# Altium PCB GamingMouse-v1.1.PcbDoc (part 3 of 3)
Units mil, origin at the board's own origin, x right, y up, seen from the top; angles counter-clockwise.
Board outline 3390 x 1696.57 mil, 2 copper layers (Top Layer, Bottom Layer), stack 61.811 mil thick; 112 components, 70 nets, 346 pads, 115 vias.
Unrouted connection lines stored in the file: 47.
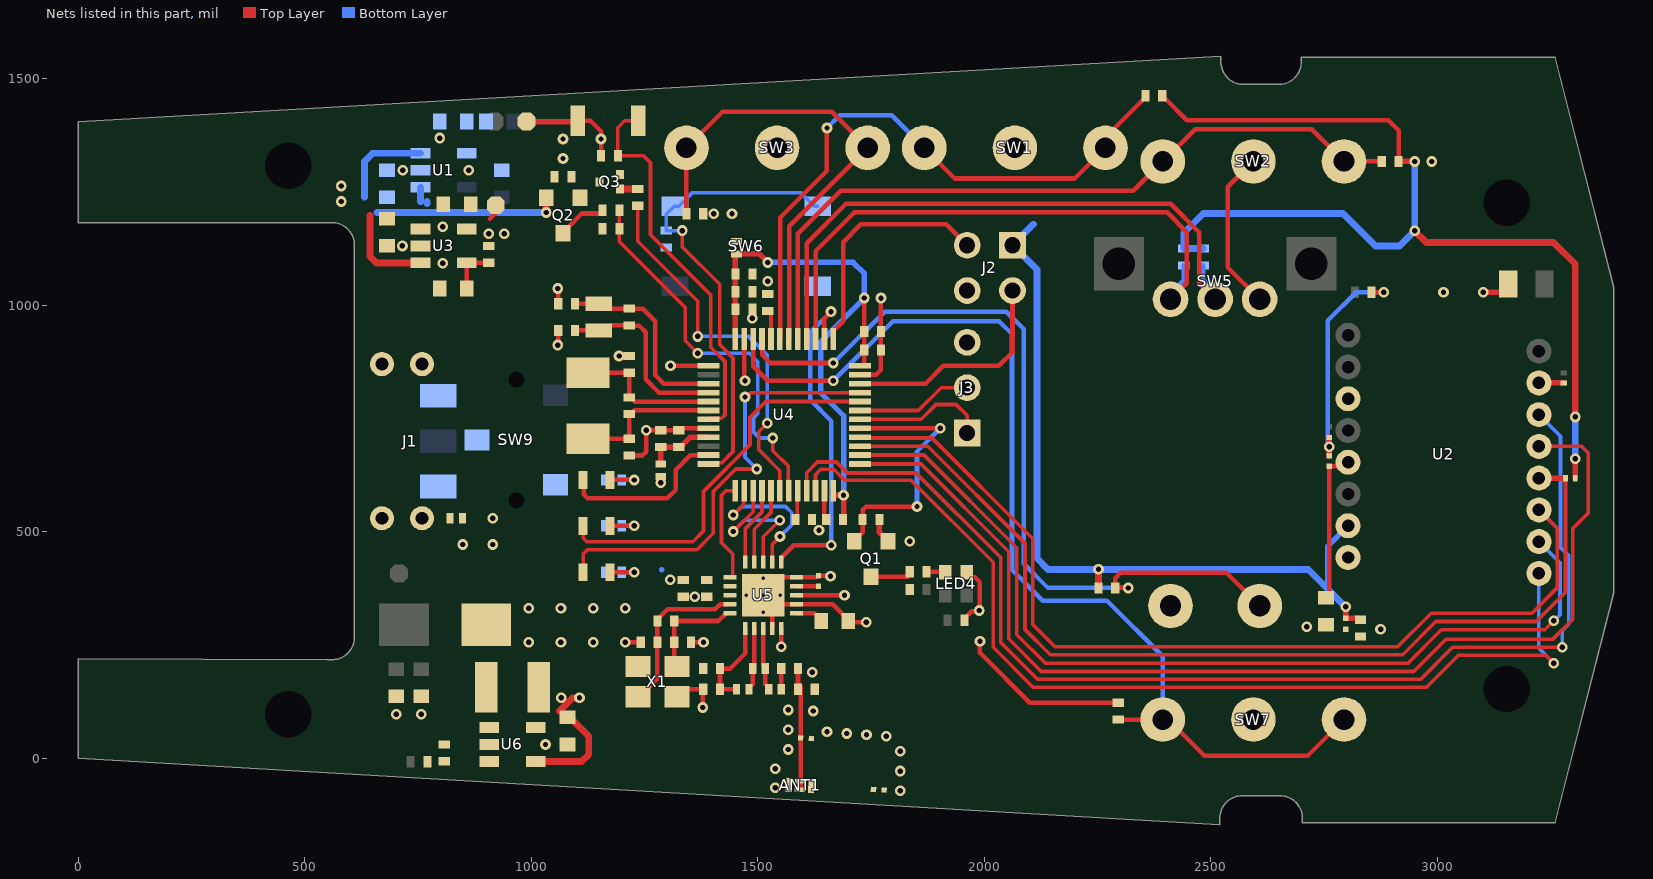
[diagram p2: the nets of this part, all layers, seen from the top]

## Via types
v1: diameter 23.62, hole 11.81, Top Layer to Bottom Layer, tented both sides, 101 vias
v2: diameter 23.62, hole 11.81, Top Layer to Bottom Layer, 14 vias

## Nets (pads, with @x,y where several pads share a name; then routed paths per layer and width w, separated by ;. In a path a pad name is that pad's centre, name@x,y a point inside that pad or via, vN(x,y) a via of type N, cw(c..) or ccw(c..) an arc to the next point about the centre after c; other vN are vias at no path point) (continued)
+3.3V: C8.2 C9.2 C10.2 C12.2 C13.2 C36.2 FB2.2 FB3.1 J2.1 L4.1 P3.1 Q1.1 R3.2 R5.2 R6.2 R7.2 R17.2 R18.2 R19.2 R20.2 R23.2 R24.2 R25.1 U2.7 U3.5 U4.1 U5.7 U5.15 U5.18 U6.4 U6.5 | length 5067
  Top Layer w10: 909.18,1191.01 919.17,1201 ; v1(1307.73,866.28) U4.1@1391.54,866.28 ; v1(1551.76,246.26) U5.15@1551.76,286.18 ; U5.18@1586.01,359.8 1586.09,359.88 1691.34,359.88 v1(1691.71,360.24) ; Q1.1@1787.6,479.38 Q1.1@1787.6,481.35 ; v1(1990.68,258.65) 1990.68,232.81 2100.89,122.59 R24.2@2295.72,122.59 ; R17.2@2393.02,1462.67 2393.02,1459.17 2397.02,1455.17 2400.52,1455.17 2446.91,1408.78 2891.89,1408.78 2914.69,1385.98 R18.2@2914.69,1317.5
  Top Layer w12: R25.1@1768.7,527.01 1768.7,498.52 1775.73,491.49 1777.46,491.49 Q1.1@1787.6,481.35 ; v1(2797.83,334.44) C8.2@2797.83,308.78 2827.93,308.78 C9.2@2830.82,305.89 ; R18.2@2914.69,1317.5 v1(2950.32,1317.5)
  Top Layer w13: R3.2@3304.74,618.45 v1(3304.74,660.96)
  Top Layer w15: U6.4@1009.96,-6.86 1111.61,-6.86 1127.3,8.83 1127.3,48.62 1085.38,90.54 C36.2@1079.96,90.54 ; 1061.89,103.82 1091.51,133.44 v1(1106.86,133.44) ; v1(1286.43,607.96) FB3.1@1286.43,622.19 ; R19.2@2252.21,376.01 v1(2252.21,416.99) ; v1(2950.32,1164.25) 2975.94,1138.62 3256.94,1138.62 3304.74,1090.83 v1@3304.74,758.21 ; v1@3300.1,753.58 v1@3304.74,758.21 ; v1(3304.74,753.58) v1@3304.74,758.21 ; v1@3305.91,759.39 v1@3304.74,758.21
  Bottom Layer w12: 1287.86,415.8 1288.14,416.08 ; 2757.97,374.31 2757.97,468.03 U2.7@2803.27,513.33
  Bottom Layer w15: 2108.94,1178.94 J2.1@2062.5,1132.5 2116.48,1078.52 2116.48,441.64 2141.14,416.99 v1(2252.21,416.99) 2715.29,416.99 2757.97,374.31 v1(2797.83,334.44) ; R6.2@2483.51,1125.07 R5.2@2440.53,1125.07 2440.53,1159.51 2483.57,1202.56 2792.26,1202.56 2863.87,1130.95 2917.02,1130.95 v1(2950.32,1164.25) v1(2950.32,1317.5) ; v1(3304.74,660.96) v1(3304.74,753.58)
  other v1: 1066.37,133.44 1307.15,394.36 1835.86,479.38 906.18,1158.01 940.63,1158.12 1403.28,1202.3 1443.44,1202.3
ADJ1: R1.1 R2.2 U1.4
ADJ2: R7.1 R8.2 U3.4 | length 107.7
  Top Layer w10: R8.2@858.04,1037.13 U3.4@858.04,1093.61 858.12,1093.69 909.11,1093.69 R7.1@909.18,1093.76
ANT: ANT1.2 ANT1.3 C16.2 C17.1 C38.2 | length 279.5
  Top Layer w10: C16.2@1589.08,198.11 C17.1@1589.08,152.18 C17.1@1593.08,148.18 ; ANT1.2@1594.86,-69.01 C38.2@1594.86,45.01 C17.1@1594.86,158.95
BAT_ADC: R28.1 R31.2 U4.19 | length 865.1
  Top Layer w8: R28.1@1194.74,1209.64 R31.2@1194.74,1168.82 1194.74,1140.54 1340.38,994.9 1340.38,921.54 v1(1367.52,894.39) ; v1(1533.52,707.02) 1533.52,678.98 1567.32,645.19 1567.32,615.32
  Top Layer w10: 1567.32,615.32 1567.41,615.23 1567.41,591.99 U4.19@1568.71,590.69
  Bottom Layer w8: v1(1367.52,894.39) 1481.29,894.39 1500.52,875.16 1500.52,760.77 1491.74,751.99 1491.74,719.25 1503.98,707.02 v1(1533.52,707.02)
BAT_STAT: R30.1 U4.18 | length 840.4
  Top Layer w8: R30.1@1235.18,1219.8 1235.18,1141.03 1367.52,1008.69 v1(1367.52,931.24) ; v1(1520.9,739.46) 1502.2,720.77 1502.2,681.51 1549.01,634.7 U4.18@1549.01,590.7
  Bottom Layer w8: v1(1367.52,931.24) 1479.8,931.24 1520.9,890.14 v1(1520.9,739.46)
CPI: R23.1 SW6.1 SW6.2 U4.12 | length 1037.8
  Top Layer w8: v1(1333.86,1164.83) 1333.86,1128.41 1416.03,1046.24 1416.03,913.4 1445.61,883.83 1445.61,677.2 1420.45,652.04 1393.84,652.04 U4.12@1391.54,649.74
  Bottom Layer w8: v1(1333.86,1164.83) R23.1@1297.95,1164.83 1297.95,1201.1 1315.61,1218.76 SW6.2@1317.76,1218.76 1325.63,1218.76 1354.88,1248 1595.6,1248 1624.85,1218.76 SW6.1@1632.72,1218.76
GND: ANT1.4 C1.1 C2.1 C3.1 C4.1 C5.1 C6.1 C7.1 C8.1 C9.1 C10.1 C11.1 C12.1 C13.1 C14.1 C15.1 C17.2 C18.2 C19.1 C20.2 C21.1 C22.1 C23.1 C24.1 C25.1 C26.1 C27.1 C28.2 C29.1 C30.1 C31.1 C32.1 C33.1 C34.1 C35.1 C36.1 C37.2 C38.1 C39.1 FB1.2 J2.4 J3.3 LED4.3 P5.1 Q3.2 R2.1 R8.1 R9.1 R10.1 R11.2 R12.1 R21.1 R31.1 R34.2 R35.1 SW1.2 SW2.2 SW3.2 SW4.2 SW5.C SW6.3 SW7.2 SW8.2 U1.2 U2.3 U2.8 U3.2 U4.8 U4.23 U4.35 U4.47 U5.8 U5.14 U5.17 U5.20 U5.21 U6.2 X1.2 X1.4 | length 2607.6
  Top Layer w10: v1(1059,912.13) 1059.43,912.56 1059.43,944.05 C33.1@1059.86,944.48 ; v1(1059,1037.13) 1059.43,1036.69 1059.43,1003.97 C31.1@1059.86,1003.54 ; SW8.2@1101.19,1405.27 SW8.2@1102.93,1407.01 1131.11,1407.01 1154.36,1383.76 C30.1@1154.36,1330.01 ; v1(1194.13,888.08) C32.1@1216.36,888.08 ; v1(1208,256.11) 1240.66,256.1 C28.2@1241.86,256.1 ; C29.1@1216.36,668.41 1245.58,668.41 1253.86,676.69 v1(1253.86,724.01) C20.2@1286.43,724.01 C19.1@1325.86,724.01 1331.64,724.01 1336.11,728.48 U4.8@1391.54,728.48 ; X1.4@1322.17,135.63 1338.71,152.18 C14.1@1379.86,152.18 1378.69,151 v1(1378.69,112.01) ; C18.2@1352.86,256.1 v1(1380.53,256.09) ; U4.47@1470.28,925.34 1470.28,834.96 v1(1472.03,833.21) ; U5.21@1512.39,359.8 U5.21@1532.08,340.11 ; U5.21@1512.39,397.2 1514.36,399.17 U5.20@1586.01,399.17 1630.45,399.17 C27.1@1634.39,403.11 1634.95,402.54 1660.27,402.54 v1(1660.83,401.98) ; U5.14@1532.08,286.18 U5.21@1532.08,340.11 ; U4.23@1647.45,590.69 1647.45,527.01 1649.45,525.01 C22.1@1649.45,521.51 ; U4.35@1726.19,846.59 1761.38,846.59 1772.19,857.4 C23.1@1772.19,901.32 C21.1@1772.19,942.22 v1(1772.19,1015.84) ; v1(1739.86,300.17) 1702.88,300.17 R12.1@1700.19,302.87 1700.19,305.37 1665.44,340.11 U5.17@1586.01,340.11 U5.21@1532.08,340.11 ; C37.2@1956.36,304.96 1956.36,308.46 1972.42,324.51 1987.14,324.51 v1(1988.91,326.28) ; LED4.3@1961.49,410.58 1961.49,408.61 1970.26,399.83 1979.77,399.83 1990.68,388.93 v1@1990.68,324.51 ; SW2.2@2594.25,1317.5 2538,1261.25 2538,1083.46 SW5.C@2608.19,1013.27 ; C2.1@2855.23,1029.01 2855.48,1028.76 2881.61,1028.76 v1(2881.86,1028.51)
  Top Layer w12: P5.1@989.86,1405.27 SW8.2@1101.19,1405.27 ; C6.1@2761.86,667.97 C1.1@2761.86,708.2 ; v1(3101.86,1028.51) 3142.86,1028.51 3157.76,1043.41 C7.1@3157.76,1044.94
  Top Layer w15: R8.1@797.86,1028.31 R8.1@798.04,1028.13
  Bottom Layer w10: v1(2761.86,688.01) 2761.15,688.01 2758.5,690.65 2758.5,692.12 2757.92,692.7 2757.92,965.86 2821.08,1029.02 2881.36,1029.02 v1(2881.86,1028.51)
  other v1: 1031.61,30.54 702.24,97.01 757.36,97.01 994.59,256.11 1065.72,256.11 1136.86,256.11 2875,285.16 2712,290.13 994.59,331.01 1065.73,331.01 1136.86,331.01 1208,331.01 1360.86,356.67 848.72,471.99 915.22,471.99 1635.53,503.34 915.22,529.92 1488.04,971.16 3013.9,1028.51 1522.34,1053.01 804.88,1092.76 715.86,1131.01 804.88,1173.01 716.86,1298.01 861.99,1298.01 2987.86,1317.51 1070.44,1323.83 1070.44,1367.01 1154.36,1367.01 798.04,1369.01
  other v2: 1814.86,-71.85 1538.86,-64.77 1814.86,-28.23 1538.86,-22.99 1814.86,15.39 1567.21,19.56 1784.03,48.77 1740.41,51.77 1696.79,54.77 1653.16,58.77 1567.21,63.18 1622.51,104.56 1567.21,106.8 1620.31,189.75
"LED1 (TX)": J3.1 U4.30 | length 298.4
  Top Layer w8: U4.30@1726.19,748.17 1860.85,748.17 1893.67,780.98 1938.02,780.98 1962.5,756.5 J3.1@1962.5,718.13
"LED2 (RX)": J3.2 U4.31 | length 257.1
  Top Layer w8: U4.31@1726.19,767.85 1854.76,767.85 1905.03,818.13 J3.2@1962.5,818.13
LED_DIN: LED4.4 R27.2 | length 41.9
  Top Layer w10: R27.2@1872.86,411.74 1913.08,411.74 LED4.4@1914.24,410.58
LED_IO: Q1.2 R25.2 U4.29 | length 571.7
  Top Layer w10: Q1.2@1712.8,479.38 1712.8,481.35 1722.94,491.49 1724.67,491.49 1731.7,498.52 R25.2@1731.7,527.01 1732,527.31 1732,548.65 1739,555.66 v1(1851.7,555.66) ; U4.29@1726.19,728.48 v1(1903,728.48)
  Bottom Layer w10: v1(1851.7,555.66) 1851.7,677.19 v1(1903,728.48)
LEFT: R18.1 SW2.1 SW2.3 U4.41 | length 1646.9
  Top Layer w10: U4.41@1588.39,925.34 1588.39,1157.54 1683.33,1252.48 2329.23,1252.48 SW2.1@2394.25,1317.5 2465.62,1388.86 2722.89,1388.86 SW2.3@2794.25,1317.5 R18.1@2877.69,1317.5
MIDDLE: R19.1 SW4.1 U4.45 | length 1895.4
  Top Layer w10: U4.45@1509.65,925.34 1509.65,891.04 1528.12,872.58 v1(1667.13,872.58) ; v1(2318.28,376.01) R19.1@2289.21,376.01 2289.21,397.79 2301.47,410.05 2534.52,410.05 SW4.1@2608.19,336.39 ; SW4.1@2578.69,344.27 SW4.1@2602.85,320.12 ; SW4.1@2634.81,363.01 SW4.1@2636.16,361.66
  Bottom Layer w10: v1(1667.13,872.58) 1780.62,986.07 2049.06,986.07 2087.51,947.61 2087.51,429.33 2140.83,376.01 v1(2318.28,376.01)
NetANT1_1: ANT1.1 C39.2
NetC5_2: C5.2 C6.2 U2.5 | length 335.5
  Top Layer w10: C5.2@2754.48,354.39 2761.86,361.76 C6.2@2761.86,644.35 ; C6.2@2762.86,644.33 2794.73,644.33 U2.5@2802.22,651.81
NetC14_2: C14.2 C15.2 L1.2 U5.11 | length 207.1
  Top Layer w10: L1.2@1453.65,152.18 C14.2@1416.86,152.18 C15.2@1416.86,198.11 1439.2,198.11 1473.02,231.93 U5.11@1473.02,286.18
NetC16_1: C16.1 L3.2 | length 45.9
  Top Layer w10: L3.2@1552.08,152.18 C16.1@1552.08,198.11
NetC18_1: C18.1 R13.2 U5.10 X1.1 | length 237.3
  Top Layer w10: R13.2@1315.86,303.1 1413.36,303.1 1429.6,319.33 1429.6,320.35 1429.67,320.43 U5.10@1438.77,320.43 ; R13.2@1315.86,306.6 C18.1@1315.86,256.1 1315.86,208.87 X1.1@1322.17,202.56
NetC19_2: C19.2 C20.1 FB3.2 U4.9 | length 159.2
  Top Layer w12: C20.1@1281.3,684.01 C20.1@1284.3,687.01 ; C20.1@1282.93,687.01 C20.1@1284.3,687.01 ; FB3.2@1286.43,649.74 C20.1@1286.43,687.01 ; U4.9@1391.54,708.8 1391.24,708.5 1350.85,708.5 1329.36,687.01 C19.2@1325.86,687.01 C20.1@1286.43,687.01 ; C20.1@1284.3,687.01 C20.1@1286.43,687.01
NetC21_2: C21.2 C22.2 C23.2 C24.2 C25.2 C26.2 FB2.1 U4.24 U4.36 U4.48 | length 1279.8
  Top Layer w10: U4.36@1726.19,866.28 1733.89,866.28 1735.19,867.58 C23.2@1735.19,901.32 1735.36,901.49 1735.36,1015.84 v1(1735.53,1016.01)
  Top Layer w12: U4.48@1450.6,925.34 C26.2@1450.6,1068.33 ; C26.2@1451.01,1069.29 FB2.1@1451.01,1111.41 ; FB2.1@1453.28,1113.29 1503.59,1113.29 v1(1522.34,1094.54) ; U4.24@1667.13,590.69 1667.13,581.27 1667.43,580.97 v1(1689.59,580.97) 1689.59,528.16 C22.2@1688.45,527.01
  Bottom Layer w12: v1(1522.34,1094.54) 1710.77,1094.54 1735.53,1069.78 v1(1735.53,1016.01) 1638.83,919.32 1638.83,806.9 1689.59,756.14 v1(1689.59,580.97)
NetC27_2: C27.2 U5.19 | length 48.4
  Top Layer w10: U5.19@1586.01,379.48 C27.2@1634.39,379.48
NetC28_1: C28.1 R13.1 U5.9 X1.3 | length 361.1
  Top Layer w10: X1.3@1239.49,135.63 1278.86,175 C28.1@1278.86,256.1 1278.86,306.6 1301.74,329.48 1406.6,329.48 1417.24,340.11 U5.9@1438.77,340.11
NetD1_1: D1.1 L4.2 U6.1
NetFB1_1: FB1.1 J1.3 J1.MH1 J1.MH2 J1.MH3 J1.MH4 | length 15.8
  Top Layer w20: J1.MH2@759.15,870.08 767.8,870.08 J1.MH2@772.86,865.01
NetJ1_1: J1.1 SW9.2
NetL1_1: L1.1 L2.2 U5.12 | length 138.8
  Top Layer w10: L1.1@1481.21,152.18 1481.21,156.11 1489.08,163.99 L2.2@1489.08,198.11 1489.08,202.04 1492.71,205.67 U5.12@1492.71,286.18
NetL2_1: L2.1 L3.1 U5.13 | length 139
  Top Layer w10: U5.13@1512.39,286.18 1512.39,206.3 1516.64,202.04 L2.1@1516.64,198.11 1516.64,163.99 1524.52,156.11 L3.1@1524.52,152.18
NetLED1_2: LED1.2 R9.2 | length 80
  Top Layer w10: LED1.2@1174.93,614.31 1175.07,614.46 v1(1227.34,614.46)
  Bottom Layer w10: R9.2@1199.86,614.31 1199.94,614.38 1227.26,614.38 v1(1227.34,614.46)
NetLED2_2: LED2.2 R10.2 | length 80.9
  Top Layer w10: LED2.2@1173.86,513.31 v1(1227.34,513.31)
  Bottom Layer w10: R10.2@1199.86,513.31 v1(1227.34,513.31)
NetLED3_2: LED3.2 R11.1 | length 80.9
  Top Layer w10: LED3.2@1173.86,410.82 v1(1227.34,410.82)
  Bottom Layer w10: R11.1@1199.86,410.82 v1(1227.34,410.82)
NetQ1_3: Q1.3 R26.2 R27.1 | length 94.4
  Top Layer w10: Q1.3@1750.2,400.64 1831.86,400.64 1835.86,404.64 R27.1@1835.86,411.74
NetQ2_1: Q2.1 Q3.3 R29.2
NetQ3_1: Q3.1 R30.2 | length 38.9
  Top Layer w15: Q3.1@1196.25,1256.8 R30.2@1235.18,1256.8
NetR4_1: R4.1 U2.15 | length 54.6
  Top Layer w12: U2.15@3224.52,828.68 R4.1@3279.12,828.68
NetR12_2: R12.2 U5.16 | length 62.9
  Top Layer w10: U5.16@1586.01,320.43 1625.13,320.43 1640.19,305.37 R12.2@1640.19,302.87
NetR15_1: R15.1 R21.2 U6.3
NetR34_1: R34.1 U4.20 | length 65.8
  Top Layer w8: R34.1@1583.19,527.01 1587,530.82 1587,589.3 U4.20@1588.39,590.69
NetR35_2: R35.2 U4.44 | length 58
  Top Layer w8: U4.44@1529.34,925.34 R35.2@1529.34,983.37
NRST: C30.2 SW8.1 U4.7 | length 892.4
  Top Layer w8: SW8.1@1224.65,1377.15 1236.79,1389.3 SW8.1@1236.79,1407.01 1206.65,1407.01 1191.36,1391.73 C30.2@1191.36,1330.01 1248.1,1330.01 1263.38,1314.73 1263.38,1155.63 1396.26,1022.75 1396.26,907.63 1428.05,875.84 1428.05,757.73 1420.66,750.34 1393.71,750.34 U4.7@1391.54,748.17
OSC32_IN: C31.2 R16.2 U4.3 X3.2 | length 437.6
  Top Layer w10: C31.2@1096.86,1003.54 X3.2@1149.36,1003.54 1163.14,1003.54 1174.17,992.51 R16.2@1216.36,992.51 1246.32,992.51 1273.84,965 1273.84,845.93 1292.86,826.91 U4.3@1391.54,826.91
OSC32_OUT: C33.2 R16.1 U4.4 X3.1 | length 421.5
  Top Layer w10: C33.2@1096.86,944.48 X3.1@1149.36,944.48 1163.14,944.48 1174.17,955.51 R16.1@1216.36,955.51 1216.68,955.19 1238.01,955.19 1252.75,940.45 1252.75,836.59 1282.11,807.22 1351.73,807.22 U4.4@1391.54,807.22
OSCIN: C32.2 R14.1 U4.5 X2.2 | length 324.3
  Top Layer w10: X2.2@1125.36,851.08 C32.2@1216.36,851.08 R14.1@1216.36,796.74 1219.86,796.74 1229.06,787.54 U4.5@1391.54,787.54
OSCOUT: C29.2 R14.2 U4.6 X2.1 | length 323.9
  Top Layer w10: X2.1@1125.36,705.41 C29.2@1216.36,705.41 R14.2@1216.36,759.74 1219.86,759.74 1227.98,767.85 U4.6@1391.54,767.85
PA1: LED1.1 U4.11 | length 376.3
  Top Layer w10: LED1.1@1115.87,614.31 1115.87,582.57 1124.43,574.01 1300.76,574.01 1319.66,592.92 1319.66,637.02 1351.47,668.82 1390.93,668.82 U4.11@1391.54,669.43
PA11: LED2.1 U4.32 | length 856.1
  Top Layer w8: LED2.1@1114.81,512.56 1115.37,512 1115.37,485.56 1122.97,477.97 1356.52,477.97 1380.49,501.93 1380.49,589.1 1483.22,691.83 1483.22,752.68 1518.08,787.54 U4.32@1726.19,787.54
PA12: LED3.1 U4.33 | length 983
  Top Layer w8: LED3.1@1114.81,410.82 1114.81,450.85 1124.49,460.54 1365.97,460.54 1402.11,496.68 1402.11,588.82 1451.9,638.61 v1(1498.14,638.61) ; v1(1472.03,797.54) 1474.85,797.54 1484.53,807.22 U4.33@1726.19,807.22
  Bottom Layer w8: v1(1472.03,797.54) 1472.03,664.71 v1(1498.14,638.61)
PAW_MISO: R3.1 U2.12 U4.27 | length 2222.6
  Top Layer w8: U4.27@1726.19,689.11 1875.28,689.11 2090.1,474.3 2090.1,284.25 2145.75,228.6 2923.76,228.6 2997,301.85 3218.31,301.85 3283.08,366.63 R3.1@3283.08,618.45
  Top Layer w12: U2.12@3224.52,618.45 R3.1@3279.12,618.45
PAW_MOSI: U2.11 U4.28 | length 2083.9
  Top Layer w8: U4.28@1726.19,708.8 1727.97,707.01 1884.83,707.01 2106.93,484.91 2106.93,295.59 2156.5,246.01 2912.29,246.01 2986.6,320.32 3209.02,320.32 3264.6,375.9 3264.6,508.29 U2.11@3224.52,548.37
PAW_MOTION: U2.9 U4.22 | length 2227
  Top Layer w8: U4.22@1627.76,590.69 1627.76,626.13 1639.47,637.84 1667.85,637.84 1691.63,614.05 1838.26,614.05 2019.79,432.52 2019.79,245.32 2108.62,156.5 2975.51,156.5 3046.14,227.13 3240.41,227.13 v1(3257.41,210.13)
  Bottom Layer w8: U2.9@3224.52,408.21 3224.52,243.02 v1(3257.41,210.13)
PAW_RESET: U2.14 U4.21 | length 2603.9
  Top Layer w8: U4.21@1608.08,590.69 1606.63,590.69 1608.08,592.14 1608.08,630.44 1631.74,654.1 1674.23,654.1 1698.45,629.88 1849.57,629.88 2036.93,442.52 2036.93,255.29 2118.11,174.1 2962.98,174.1 3033.89,245.02 v1(3275.91,245.02)
  Bottom Layer w8: U2.14@3224.52,758.6 3272.26,710.87 3272.26,465.49 3290.05,447.7 3290.05,295.76 3275.91,281.62 v1(3275.91,245.02)
PAW_SCK: U2.10 U4.26 | length 2074.7
  Top Layer w8: U4.26@1726.19,669.43 1867.2,669.43 2072.16,464.47 2072.16,272.74 2135.16,209.74 2935.45,209.74 3009.17,283.47 3237.41,283.47 v1(3257.41,303.47) 3259,305.05 v1@3259,305.13
  Bottom Layer w8: U2.10@3224.52,478.29 3270.92,431.89 3270.92,316.98 v1(3257.41,303.47)
PAW_SS: U2.13 U4.25 | length 2419.4
  Top Layer w8: U4.25@1726.19,649.74 1860.38,649.74 2053.93,456.19 2053.93,263.79 2126.17,191.55 2948.21,191.55 3019.78,263.13 3255.53,263.13 3299.56,307.16 3299.56,507.76 3333.44,541.63 3333.44,673.69 3318.6,688.52 U2.13@3224.52,688.52
REAR_DOWN: R20.1 SW3.1 SW3.3 U4.42 | length 1105.4
  Top Layer w10: R20.1@1342.86,1202.3 SW3.1@1342.86,1347.5 1422.38,1427.01 1663.35,1427.01 SW3.3@1742.86,1347.5 1569.63,1174.26 1569.63,926.26 U4.42@1568.71,925.34
REAR_UP: R17.1 SW1.1 SW1.3 U4.43 | length 1373
  Top Layer w10: U4.43@1549.02,925.34 1550.1,926.42 1550.1,1193.87 1653,1296.77 v1(1653,1391.13) ; SW1.1@1867.75,1347.5 1935.42,1279.83 2200.08,1279.83 SW1.3@2267.75,1347.5 2267.75,1370.9 2356.02,1459.17 R17.1@2356.02,1462.67
  Bottom Layer w10: v1(1653,1391.13) 1681.39,1419.51 1795.74,1419.51 SW1.1@1867.75,1347.5
RF_CE: U4.38 U5.1 | length 752.3
  Top Layer w10: U5.1@1551.76,433.42 1551.76,442.52 1579.6,470.36 v1(1662.66,470.36) ; U4.38@1647.45,925.34 1647.45,971.6 v1(1661.92,986.07)
  Bottom Layer w10: v1(1661.92,986.07) 1616.01,940.16 1616.01,791.16 1662.66,744.51 v1(1662.66,470.36)
RF_IRQ: U4.13 U5.6 | length 231.9
  Top Layer w8: U5.6@1438.77,399.17 1444.01,399.17 1444.93,400.09 1444.93,450.92 1420.31,475.54 1420.31,580.89 1430.11,590.69 U4.13@1450.6,590.69
RF_MISO: U4.16 U5.5 | length 172.4
  Top Layer w8: U5.5@1473.02,433.42 1473.02,507.26 1509.65,543.89 U4.16@1509.65,590.69
RF_MOSI: U4.17 U5.4 | length 172.4
  Top Layer w8: U5.4@1492.71,433.42 1492.71,505.83 1529.34,542.46 U4.17@1529.34,590.69
RF_SCK: U4.15 U5.3 | length 328.8
  Top Layer w8: v1(1446.12,500.52) 1489.97,544.37 U4.15@1489.97,590.69 ; U5.3@1512.39,433.42 1512.39,488.88 v1(1549,525.5)
  Bottom Layer w8: v1(1446.12,500.52) 1471.1,525.5 v1(1549,525.5)
RF_SS: U4.14 U5.2 | length 332.8
  Top Layer w8: v1(1446.12,537.02) 1469.39,560.29 1469.39,589.8 U4.14@1470.28,590.69 ; U5.2@1532.08,433.42 1532.08,472.07 v1(1549.47,489.46)
  Bottom Layer w8: v1(1446.12,537.02) 1465.03,555.94 1561.28,555.94 1575.16,542.06 1575.16,515.16 v1(1549.47,489.46)
RIGHT: R24.1 SW7.1 SW7.3 U4.46 | length 2346.6
  Top Layer w10: U4.46@1489.97,925.34 1489.98,865.53 1522.31,833.21 1575.76,833.21 v1(1667.13,833.21) ; R24.1@2295.72,85.59 SW7.1@2394.25,85.59 2405.98,85.59 2485.49,6.08 2714.74,6.08 SW7.3@2794.25,85.59
  Bottom Layer w10: v1(1667.13,833.21) 1798.23,964.31 2033.64,964.31 2061.39,936.56 2061.39,416.12 2129.34,348.17 2271,348.17 2394.25,224.91 SW7.1@2394.25,85.59
SWCLK: J2.3 U4.37 | length 532.2
  Top Layer w10: U4.37@1667.13,925.34 1667.13,943.05 1688.73,964.65 1688.73,1139.46 1727.92,1178.65 1916.35,1178.65 J2.3@1962.5,1132.5
SWDIO: J2.2 U4.34 | length 501.2
  Top Layer w10: U4.34@1726.19,826.91 1870.55,826.91 1909.77,866.13 2032.24,866.13 2062.5,896.39 J2.2@2062.5,1032.5
V_BATT: C3.2 C11.2 Q2.2 R29.1 SW9.3 U1.1 U1.3 U3.1 U3.3 | length 863
  Top Layer w15: v1(580.86,1263.42) v1@582.51,1261.77 ; 644,1197.88 644,1108.09 658.47,1093.61 U3.3@755.68,1093.61 ; v1(1033.04,1204.61) Q2.2@1033.04,1237.77
  Bottom Layer w15: 632.11,1238.51 632.11,1317.71 649.81,1335.41 U1.3@755.68,1335.41 ; 659.66,1204.61 v1(1033.04,1204.61) ; 755.68,1228.6 U1.1@755.68,1260.61 ; 769.84,1224.51 769.84,1229.02
  other v1: 580.86,1229.01
V_MON: Q2.3 R28.2 | length 111.2
  Top Layer w10: Q2.3@1070.44,1159.03 1070.44,1161 1081.59,1172.14 1112,1202.55 1153.74,1202.55 1157.74,1206.55 R28.2@1157.74,1209.64
ZA: R5.1 SW5.A U4.39 | length 1316.8
  Top Layer w10: U4.39@1627.76,925.34 1627.76,1119.08 1713.69,1205.01 2403.86,1205.01 2447.53,1161.35 2447.53,1048.7 SW5.A@2412.09,1013.27
  Bottom Layer w10: SW5.A@2411.34,1013.27 2411.34,1026.22 2440.53,1055.41 R5.1@2440.53,1088.07
ZB: R6.1 SW5.B U4.40 | length 1388.8
  Top Layer w10: U4.40@1608.08,925.34 1608.08,1137.22 1694.86,1224.01 2411.73,1224.01 2475.08,1160.67 2475.08,1048.7 SW5.B@2510.51,1013.27
  Bottom Layer w10: R6.1@2483.51,1088.07 2483.51,1055.99 2509.76,1029.74 SW5.B@2509.76,1013.27
pads on no net: J1.2 LED4.2 SW5.4 SW5.5 SW6.4 SW9. SW9.1 U2.1 U2.2 U2.6 U2.16 U4.2 U4.10

## Polygon pours and split planes (outlines as drawn)
+3.3V on Bottom Layer "+3.3V_L02_P000" (solid, pour order 0): 1466,1079.25 1502.82,1116.07 1688.75,1116.07 1911.5,1116.07 1911.5,1152.38 1935.35,1176.23 1997.65,1176.23 2019.86,1154.01 2019.86,1095.01 2026.8,1088.07 2093.82,1088.07 2102.55,1096.8 2102.55,1151.08 2116.48,1165.01 2380.39,1165.01 2429.34,1116.07 2496.01,1116.07 2496.01,1139.73 2410.62,1225.13 1791.19,1225.13 1377.66,1225.13 1377.66,1142.56 992.5,1142.56 992.5,1173.01 891,1173.01 891,1096.44 923.32,1064.13 1101.39,1064.13 1237,928.51 1237,193.03 1041.69,193.03 1041.69,118.04 1041.74,118.1 1504.52,118.1 1504.52,226.19 1572.86,226.19 1572.86,263.01 1456.11,263.01 1456.11,193.03 1331.86,193.03 1331.86,685.94 1331.86,872.13 1331.86,960.89 1466,960.89
V_BATT on Bottom Layer "V_BATT_L02_P007" (solid, pour order 7): 891,993.54 931,953.54 931,857.08 972.29,857.08 972.29,683.74 1081.66,683.74 1081.66,580.6 919,580.6 919,742.13 854,742.13 853.3,742.82 853.3,912.13 620.86,912.13 620.86,993.54
GND on Bottom Layer "GND_L02_P010" (solid, remove dead copper, pour order 10): 20.86,1388.01 20.86,1198.01 556.89,1198.01 cw(c556.89,1122.9) 610,1176.01 cw(c576.54,1142.55) 623.86,1142.55 623.86,273.01 cw(c545.34,273.01) 600.86,217.48 cw(c564.75,253.6) 564.74,202.52 20.86,202.52 20.86,18.01 330.86,-1.99 484.78,-7.63 1578.41,-69.55 2480.31,-122.54 cw(c2540.86,-122.54) 2540.86,-61.99 2680.86,-61.99 cw(c2680.86,-121.99) 2740.86,-121.99 3230.86,-121.99 3310.86,158.01 3360.86,358.01 3360.86,1035.81 3300.86,1268.01 3238.36,1518.01 2719.85,1518.01 cw(c2670.86,1508.01) 2670.86,1458.01 2542.52,1458.01 cw(c2542.52,1499.67) 2500.86,1499.67 2500.86,1528.01 2276.75,1518.01
V_BATT on Bottom Layer "V_BATT_L02_P006" (solid, pour order 6): 713.15,1093.76 740.36,1093.76 740.36,1066.55 740.36,920.53 620.86,920.53 620.86,1198.28 560,1198.28 560,1294.02 639.78,1294.02 639.78,1272.42 777.34,1272.42 777.34,1198.28 713.15,1198.28
+3.3V on Bottom Layer "+3.3V_L02_P002" (solid, pour order 2): 1675.45,340.11 1675.45,384.01 1853.64,384.01 1853.64,278.01 1965.86,278.01 2015.86,278.01 2015.86,240.01 1812.86,240.01 1812.86,340.11
+3.3V on Top Layer "+3.3V_L01_P011" (solid, pour order 11): 1416.86,406.13 1416.86,384.41 1452.94,384.41 1452.94,374.56 1295.46,374.56 1295.46,406.13
GND on Top Layer "GND_L01_P001" (solid, remove dead copper, pour order 1): 20.86,1388.01 20.86,1198.01 556.89,1198.01 cw(c556.89,1122.91) 610,1176.01 cw(c576.55,1142.55) 623.86,1142.55 623.86,273.01 cw(c545.35,273) 600.86,217.48 cw(c564.75,253.59) 564.74,202.52 20.86,202.52 20.86,18.01 271.04,1.87 336.36,-0.53 2480.44,-126.5 cw(c2540.86,-122.54) 2540.86,-61.99 2680.86,-61.99 cw(c2680.87,-121.99) 2740.86,-121.99 3230.86,-121.99 3310.86,158.01 3360.86,358.01 3360.86,1035.81 3300.86,1268.01 3238.36,1518.01 2719.85,1518.01 cw(c2670.87,1508.01) 2670.86,1458.01 2542.52,1458.01 cw(c2542.52,1499.67) 2500.86,1499.67 2500.86,1528.01 2276.75,1518.01
+3.3V on Top Layer "+3.3V_L01_P003" (solid, pour order 3): 1532.39,262.01 1532.39,226.19 1794.86,226.19 1794.86,368.01 1720.76,368.01 1709.28,379.48 1675.45,379.48 1675.45,354.04 1689.37,340.11 1766.34,340.11 1766.34,262.01

## Other copper
Top Layer:
  rectangle net +3.3V: 1441.47,1132.97 1465.09,1214.8
  rectangle net +3.3V: 1370.86,1132.48 1465.09,1214.8
  rectangle net +3.3V: 1771.46,461.27 1850.01,497.49
  rectangle net NetQ2_1: 1079.94,1262.71 1159.83,1295.87
  rectangle net NetQ2_1: 1079.94,1219.66 1123.99,1295.87
  rectangle net V_BATT: 1016.9,1192.12 1060.94,1295.87
  rectangle net GND: 791.39,1116.01 821.39,1240.51
  rectangle net +1.9V: 2753.53,725.92 2767.77,751.12
  rectangle net NetFB1_1: 620.86,503.05 829.04,566.13
  rectangle net +3.3V: 3289.64,737.92 3319.84,770.35
  region net GND: 1577.05,-43.32 1563.3,-42.51 1561.43,-73.92 1575.18,-74.74
  region net NetANT1_1: 1761.99,-58.36 1611.89,-49.44 1610.57,-71.63 1760.67,-80.55
  rectangle net V_BATT: 623.86,1156.6 777.34,1237.01
  rectangle net NetQ1_3: 1826.86,360.24 1844.86,424.24
  rectangle net V_BATT: 560,1203.01 660.68,1294.02
  rectangle net 5V: 642.86,181.94 796.86,359.01
  rectangle net GND: 684.74,15.54 774.86,151.94
  rectangle net NetD1_1: 825.86,56.13 955.98,359.01
  rectangle net NetR15_1: 761.96,-18.68 929.25,4.95
  rectangle net GND: 684.74,15.54 1097.46,45.54
  rectangle net +3.3V: 988.3,56.13 1062.46,222.25
  rectangle net +3.3V: 988.3,56.13 1119.79,151.5
  rectangle net +3.3V: 836.39,1121.76 992.5,1240.51
  rectangle net GND: 664.18,1116.01 821.39,1146.01
  pour cut-out: 1178.89,991.04 1178.89,956.98 1077.86,956.98 1077.86,991.04
  pour cut-out: 1068,817.61 1068,738.87 1172.61,738.87 1172.61,817.61
  pour cut-out: 1573.73,-90.93 1770.27,-101.91 1776.86,16.01 1580.32,27
Bottom Layer:
  rectangle net +1.9V: 945.41,1388.51 1025.29,1423.51
  rectangle net +3.3V: 1903.25,242.18 1938.46,500.81
  rectangle net +3.3V: 1809.79,460.48 1938.46,500.81
  rectangle net NetJ1_1: 853.3,574.02 909,726.27
  rectangle net NetJ1_1: 755.02,574.02 909,625.98
  rectangle net GND: 2752.86,678.01 2768.86,706.86
  rectangle net NetFB1_1: 620.86,503.05 785.17,560.01
  rectangle net NetFB1_1: 620.86,503.05 706.86,896.39
  rectangle net NetFB1_1: 620.86,774.02 834.94,896.39
  rectangle net V_BATT: 734.03,1217.01 777.34,1272.42
  rectangle net +1.9V: 970.41,1223.01 1007.86,1423.51
  rectangle net GND: 783.04,1356.01 813.04,1423.51
  rectangle net ADJ1: 836.39,1323.6 879.7,1423.51
  rectangle net ADJ1: 836.39,1388.51 915.41,1423.51
  rectangle net GND: 664.18,1283.01 952.68,1313.01
  rectangle net +1.9V: 836.39,1223.01 1007.86,1272.42
  rectangle net V_BATT: 560,1217.01 777.34,1272.42
  rectangle net V_BATT: 560,1198.28 639.78,1294.02
  rectangle net 5V: 642.86,181.94 796.86,249.2
  pour cut-out: 1573.73,-90.93 1770.27,-101.91 1776.86,16.01 1580.32,27

## Silkscreen, mask and mechanical layers (free items; w line width, h text height)
Top Overlay:
  lines w5: 1177.67,606.28 1191.86,606.09
  lines w10: 22.68,1259.27 394.86,1259.27 394.86,1345.01 22.68,1345.01 22.68,1259.27
  text "GND" at 1015.29,1392.45 h23.62
  text "+1v9" at 888.63,1350.97 h23.62
  text "BATTERY LOW" at 26.73,1309 h31.5
  text "BATTERY <= 15%" at 37.09,1273.43 h25
  text "+3v3" at 892.75,1249.28 h23.62
  text "USB J-LINK" at 2143.69,982.5 h23.62 r90
  text "ENCODER" at 2236.69,981.99 h23.62 r90
  text "BATTERY FULL" at 1099.4,559.87 h27.56
  text "BATTERY LOW" at 1098.34,459.71 h27.56
  text "5V" at 678.09,437.32 h23.62
  text "POWER" at 1098.34,356.37 h27.56
  text "CPI" at 2012.01,344.99 h27.56 r90
  text "MAIN BOARD" at 2754.58,-122.87 h50
Bottom Overlay:
  drawing of 15 lines, arcs and shapes, not listed
  text "Rev-v1.1" at 342.61,1287.96 h39.37
Board Outline:
  circle w0.25: c0,0 r0.12
  lines w5: 2151.69,448.47 2742.48,448.47 2742.48,952.4 2151.69,952.4 2151.69,448.47 ; 2844.6,340.22 3183.19,340.22 3183.19,1001.78 2844.6,1001.78 2844.6,340.22
  lines w10: 0,0 2519.99,-146.57 2520,-132.48 cw(c2570,-132.48) 2570,-82.48 2652.52,-82.48 cw(c2652.52,-132.48) 2702.52,-132.48 2702.52,-142.48 3260,-142.48 3390,365 3390,1040 3260,1547.48 2700,1547.48 2700,1537.52 cw(c2650,1537.48) 2650,1487.48 2572.48,1487.48 cw(c2572.46,1537.42) 2522.52,1537.52 2522.52,1550 0,1405 0,1182.48 560,1182.48 cw(c560.06,1132.54) 610,1132.48 610,267.52 cw(c560,267.48) 560,217.48 ; 0,0.12 0,220 560,217.43
Fabrication:
  drawing of 191 lines, arcs and shapes, not listed
  text "Layer" at 4013.3,559.04 h60
  text "Name" at 4423.21,559.04 h60
  text "Material" at 5352.96,559.04 h60
  text "Thickness" at 6212.73,559.04 h60
  text "Constant" at 6862.56,559.04 h60
  text "Board Layer Stack" at 7432.42,559.04 h60
  text "Top Overlay" at 4423.21,439.04 h60
  text "Top Solder" at 4423.21,319.04 h60
  text "Solder Resist" at 5352.96,319.04 h60
  text "0.39mil" at 6212.73,319.04 h60
  text "3.5" at 6862.56,319.04 h60
  text "1" at 4013.3,199.04 h60
  text "Top Layer" at 4423.21,199.04 h60
  text "1.38mil" at 6212.73,199.04 h60
  text "Dielectric 1" at 4423.21,79.04 h60
  text "FR-4" at 5352.96,79.04 h60
  text "59.06mil" at 6212.73,79.04 h60
  text "4.8" at 6862.56,79.04 h60
  text "2" at 4013.3,-40.96 h60
  text "Bottom Layer" at 4423.21,-40.96 h60
  text "1.38mil" at 6212.73,-40.96 h60
  text "Bottom Solder" at 4423.21,-160.96 h60
  text "Solder Resist" at 5352.96,-160.96 h60
  text "0.39mil" at 6212.73,-160.96 h60
  text "3.5" at 6862.56,-160.96 h60
  text "Bottom Overlay" at 4423.21,-280.96 h60
  text "Total board thickness:" at 4013.3,-400.96 h60
  text "62.60mil" at 6212.73,-400.96 h60
Drill Drawing:
  circle w10: c4055.63,2406.4 r33.33
  circle w10: c4055.63,1506.4 r20
  circle w10: c4055.63,1506.4 r33.33
  lines w10: 4022.29,1689.73 4088.96,1689.73 4055.63,1623.07 4022.29,1689.73 ; 4022.29,1773.07 4055.63,1789.73 4088.96,1773.07 4072.29,1806.4 4088.96,1839.73 4055.63,1823.07 4022.29,1839.73 4038.96,1806.4 4022.29,1773.07 ; 4022.29,1989.73 4088.96,1989.73 4055.63,1923.07 4022.29,1989.73 ; 4022.29,2073.07 4088.96,2073.07 4088.96,2139.73 4022.29,2139.73 4022.29,2073.07 ; 4022.29,2223.07 4022.29,2239.73 4038.96,2256.4 4022.29,2273.07 4022.29,2289.73 4038.96,2289.73 4055.63,2273.07 4072.29,2289.73 4088.96,2289.73 4088.96,2273.07 4072.29,2256.4 4088.96,2239.73 4088.96,2223.07 4072.29,2223.07 4055.63,2239.73 4038.96,2223.07 4022.29,2223.07 ; 4022.29,2539.73 4038.96,2539.73 4055.63,2523.07 4072.29,2539.73 4088.96,2539.73 4072.29,2556.4 4088.96,2573.07 4072.29,2573.07 4055.63,2589.73 4038.96,2573.07 4022.29,2573.07 4038.96,2556.4 4022.29,2539.73 ; 4022.29,2673.07 4088.96,2673.07 4088.96,2739.73 4022.29,2739.73 4022.29,2673.07 ; 4022.29,2856.4 4055.63,2823.07 4088.96,2856.4 4055.63,2889.73 4022.29,2856.4 ; 4035.63,1676.4 4075.63,1676.4 4055.63,1636.4 4035.63,1676.4 ; 4035.63,2686.4 4075.63,2686.4 4075.63,2726.4 4035.63,2726.4 4035.63,2686.4
  lines w15: 3962.5,1428.07 13959.71,1428.07 ; 3962.5,2928.07 13959.71,2928.07 ; 4513.38,1278.07 4513.38,3078.07 ; 5103.22,1278.07 5103.22,3078.07 ; 6252.88,1278.07 6252.88,3078.07 ; 6758.76,1278.07 6758.76,3078.07 ; 7492.56,1278.07 7492.56,3078.07 ; 8992.11,1278.07 8992.11,3078.07 ; 9581.96,1278.07 9581.96,3078.07 ; 10327.76,1278.07 10327.76,3078.07 ; 11467.43,1278.07 11467.43,3078.07 ; 12557.11,1278.07 12557.11,3078.07 ; 3962.5,1278.07 13959.71,1278.07 13959.71,3078.07 3962.5,3078.07 3962.5,1278.07
  text "Symbol" at 4052.5,2973.07 h72
  text "Count" at 4558.38,2973.07 h72
  text "Hole Size" at 5148.22,2973.07 h72
  text "Plated" at 6297.88,2973.07 h72
  text "Hole Type" at 6803.76,2973.07 h72
  text "Drill Layer Pair" at 7537.56,2973.07 h72
  text "Via/Pad" at 9037.11,2973.07 h72
  text "Pad Shape" at 9626.96,2973.07 h72
  text "Template" at 10372.76,2973.07 h72
  text "Hole Length" at 11512.43,2973.07 h72
  text "Routed Path Length" at 12602.11,2973.07 h72
  text "5" at 4558.38,2823.07 h60
  text "7.87mil (0.200mm)" at 5148.22,2823.07 h60
  text "PTH" at 6297.88,2823.07 h60
  text "Round" at 6803.76,2823.07 h60
  text "Top Layer - Bottom Layer" at 7537.56,2823.07 h60
  text "Pad" at 9037.11,2823.07 h60
  text "Rounded" at 9626.96,2823.07 h60
  text "c0h20z40x40" at 10372.76,2823.07 h60
  text "-" at 11512.43,2823.07 h60
  text "-" at 12602.11,2823.07 h60
  text "115" at 4558.38,2673.07 h60
  text "11.81mil (0.300mm)" at 5148.22,2673.07 h60
  text "PTH" at 6297.88,2673.07 h60
  text "Round" at 6803.76,2673.07 h60
  text "Top Layer - Bottom Layer" at 7537.56,2673.07 h60
  text "Via" at 9037.11,2673.07 h60
  text "Rounded" at 9626.96,2673.07 h60
  text "(Mixed)" at 10372.76,2673.07 h60
  text "-" at 11512.43,2673.07 h60
  text "-" at 12602.11,2673.07 h60
  text "16" at 4558.38,2523.07 h60
  text "27.56mil (0.700mm)" at 5148.22,2523.07 h60
  text "PTH" at 6297.88,2523.07 h60
  text "Round" at 6803.76,2523.07 h60
  text "Top Layer - Bottom Layer" at 7537.56,2523.07 h60
  text "Pad" at 9037.11,2523.07 h60
  text "Rounded" at 9626.96,2523.07 h60
  text "c140h70m150mx150p0" at 10372.76,2523.07 h60
  text "-" at 11512.43,2523.07 h60
  text "-" at 12602.11,2523.07 h60
  text "4" at 4558.38,2373.07 h60
  text "28.35mil (0.720mm)" at 5148.22,2373.07 h60
  text "PTH" at 6297.88,2373.07 h60
  text "Round" at 6803.76,2373.07 h60
  text "Top Layer - Bottom Layer" at 7537.56,2373.07 h60
  text "Pad" at 9037.11,2373.07 h60
  text "Rounded" at 9626.96,2373.07 h60
  text "c135h72" at 10372.76,2373.07 h60
  text "-" at 11512.43,2373.07 h60
  text "-" at 12602.11,2373.07 h60
  text "7" at 4558.38,2223.07 h60
  text "35.43mil (0.900mm)" at 5148.22,2223.07 h60
  text "PTH" at 6297.88,2223.07 h60
  text "Round" at 6803.76,2223.07 h60
  text "Top Layer - Bottom Layer" at 7537.56,2223.07 h60
  text "Pad" at 9037.11,2223.07 h60
  text "(Mixed)" at 9626.96,2223.07 h60
  text "(Mixed)" at 10372.76,2223.07 h60
  text "-" at 11512.43,2223.07 h60
  text "-" at 12602.11,2223.07 h60
  text "2" at 4558.38,2073.07 h60
  text "35.43mil (0.900mm)" at 5148.22,2073.07 h60
  text "NPTH" at 6297.88,2073.07 h60
  text "Round" at 6803.76,2073.07 h60
  text "Top Layer - Bottom Layer" at 7537.56,2073.07 h60
  text "Pad" at 9037.11,2073.07 h60
  text "Rounded" at 9626.96,2073.07 h60
  text "c0hn90" at 10372.76,2073.07 h60
  text "-" at 11512.43,2073.07 h60
  text "-" at 12602.11,2073.07 h60
  text "12" at 4558.38,1923.07 h60
  text "45.28mil (1.150mm)" at 5148.22,1923.07 h60
  text "PTH" at 6297.88,1923.07 h60
  text "Round" at 6803.76,1923.07 h60
  text "Top Layer - Bottom Layer" at 7537.56,1923.07 h60
  text "Pad" at 9037.11,1923.07 h60
  text "Rounded" at 9626.96,1923.07 h60
  text "c250h115" at 10372.76,1923.07 h60
  text "-" at 11512.43,1923.07 h60
  text "-" at 12602.11,1923.07 h60
  text "5" at 4558.38,1773.07 h60
  text "47.24mil (1.200mm)" at 5148.22,1773.07 h60
  text "PTH" at 6297.88,1773.07 h60
  text "Round" at 6803.76,1773.07 h60
  text "Top Layer - Bottom Layer" at 7537.56,1773.07 h60
  text "Pad" at 9037.11,1773.07 h60
  text "Rounded" at 9626.96,1773.07 h60
  text "(Mixed)" at 10372.76,1773.07 h60
  text "-" at 11512.43,1773.07 h60
  text "-" at 12602.11,1773.07 h60
  text "2" at 4558.38,1623.07 h60
  text "71.65mil (1.820mm)" at 5148.22,1623.07 h60
  text "PTH" at 6297.88,1623.07 h60
  text "Rectangle" at 6803.76,1623.07 h60
  text "Top Layer - Bottom Layer" at 7537.56,1623.07 h60
  text "Pad" at 9037.11,1623.07 h60
  text "Rectangle" at 9626.96,1623.07 h60
  text "(Mixed)" at 10372.76,1623.07 h60
  text "82.68mil (2.100mm)" at 11512.43,1623.07 h60
  text "82.68mil (2.100mm)" at 12602.11,1623.07 h60
  text "4" at 4558.38,1473.07 h60
  text "102.36mil (2.600mm)" at 5148.22,1473.07 h60
  text "NPTH" at 6297.88,1473.07 h60
  text "Round" at 6803.76,1473.07 h60
  text "Top Layer - Bottom Layer" at 7537.56,1473.07 h60
  text "Pad" at 9037.11,1473.07 h60
  text "Rounded" at 9626.96,1473.07 h60
  text "c0hn260" at 10372.76,1473.07 h60
  text "-" at 11512.43,1473.07 h60
  text "-" at 12602.11,1473.07 h60
  text "172 Total" at 4558.38,1323.07 h60
  text "Slot definitions :" at 4052.5,1178.09 h60
  text "Routed Path Length" at 5085.19,1178.09 h60
  text "= Calculated from tool start centre position to tool end centre position." at 6187.86,1178.09 h60
  text "Hole Length" at 5085.19,1078.12 h60
  text "= Routed Path Length + Tool Size = Slot length as defined in the PCB layout" at 5777.99,1078.12 h60

## Text inside footprints (layer, text, board x,y; h text height)
J1: Bottom Overlay "PCB Edge" at 625.37,579.02 h31.5 r270
U2: Top Overlay "1" at 2819.37,964.02 h23.62